# Altium PCB Adv-OLED_v2.0.PcbDoc
Units mm, origin at the board's own origin, x right, y up, seen from the top; angles counter-clockwise.
Board outline 87.98 x 43 mm, 2 copper layers (Top Layer, Bottom Layer), stack 1.448 mm thick; 22 components, 23 nets, 96 pads, 19 vias.
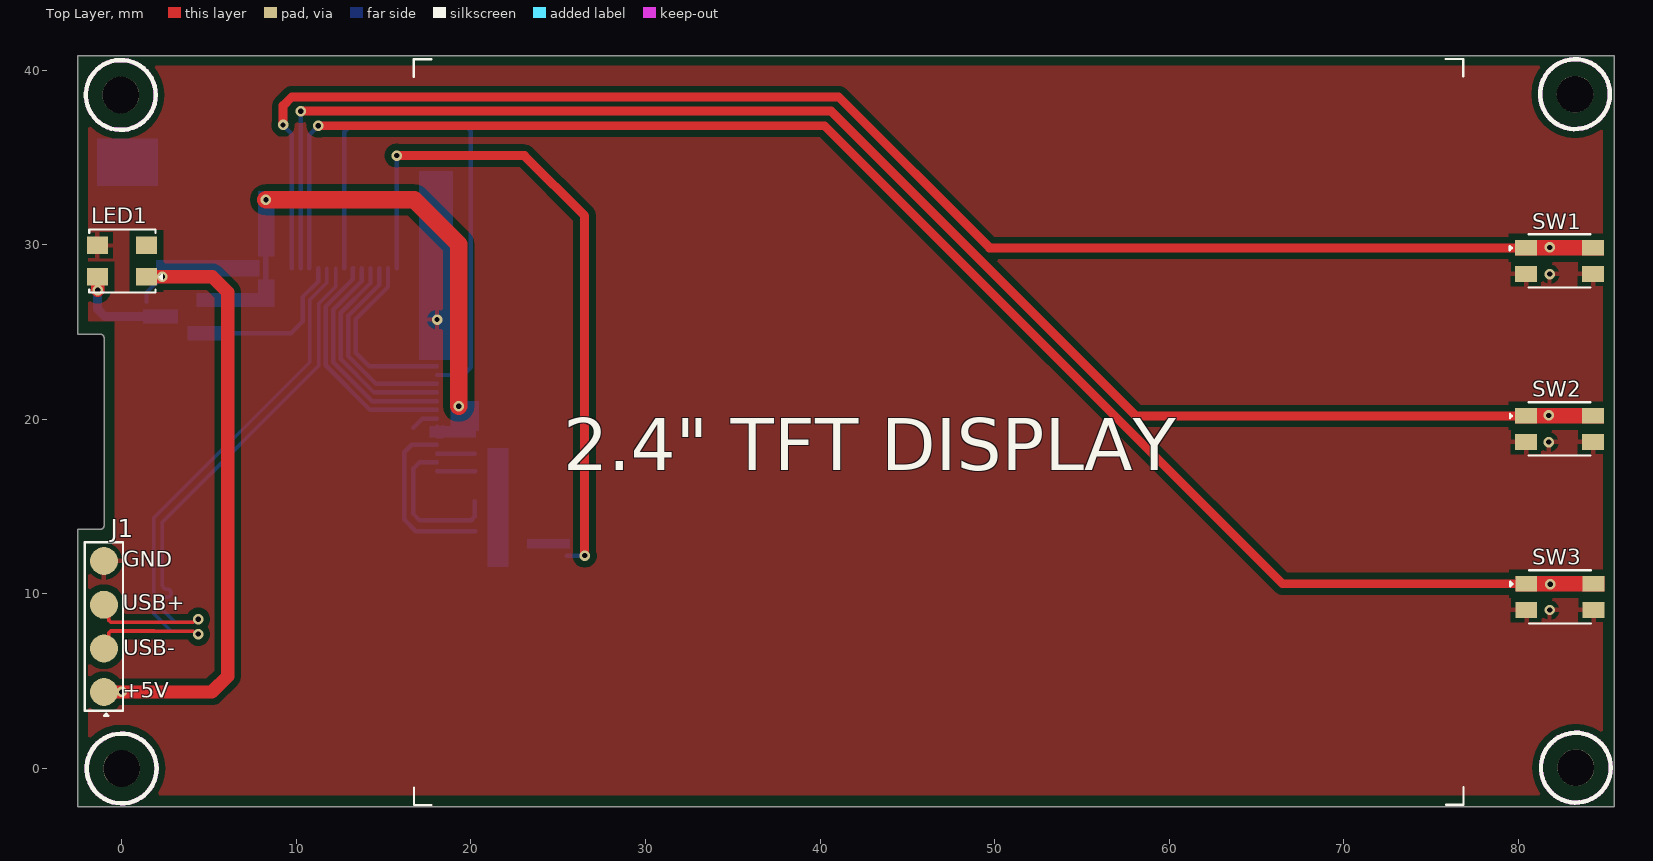
[diagram p0: Top Layer view]
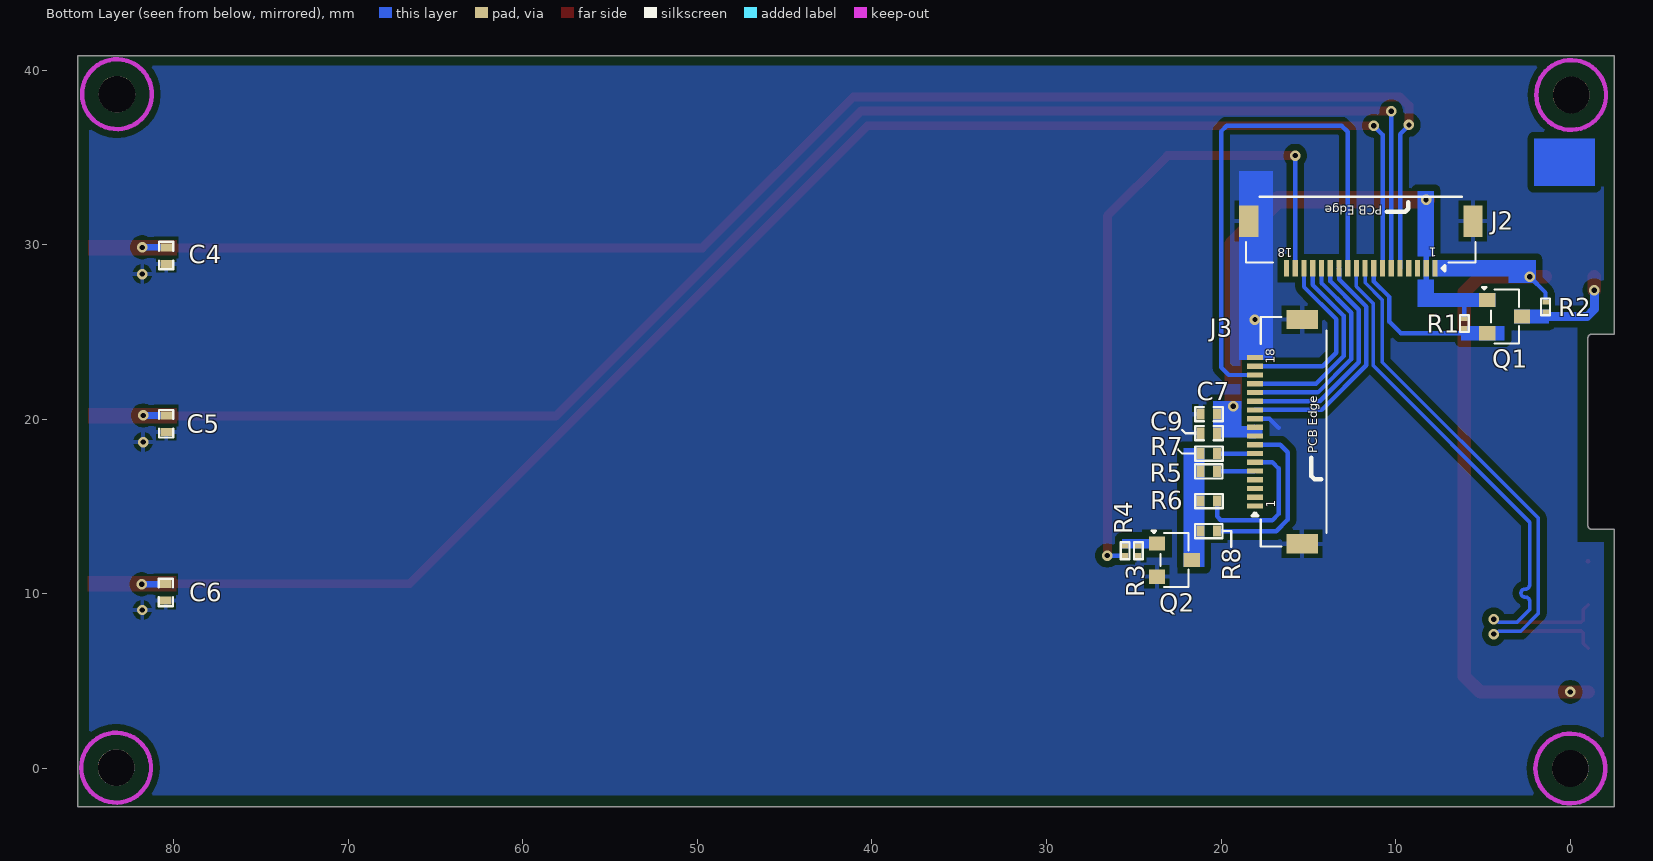
[diagram p1: Bottom Layer view, seen from below]
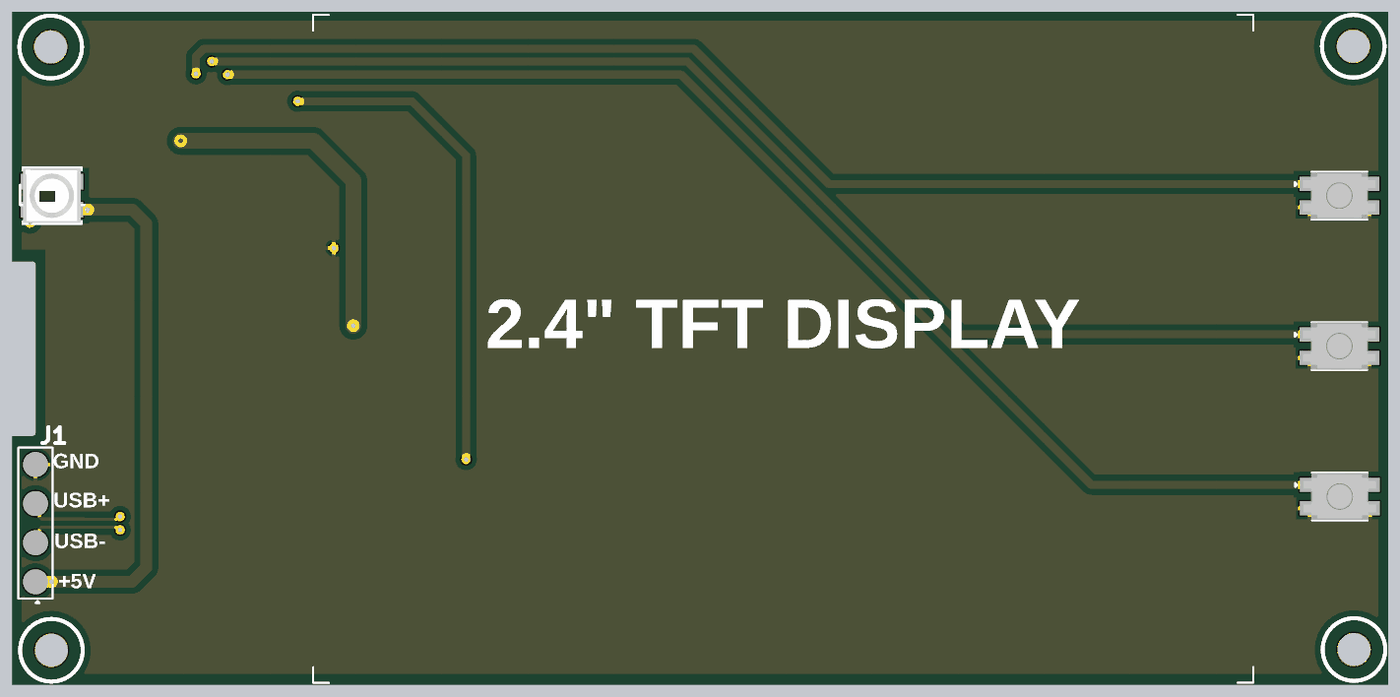
[diagram p2: 3D render of the assembled board from above, using the file's embedded part models]
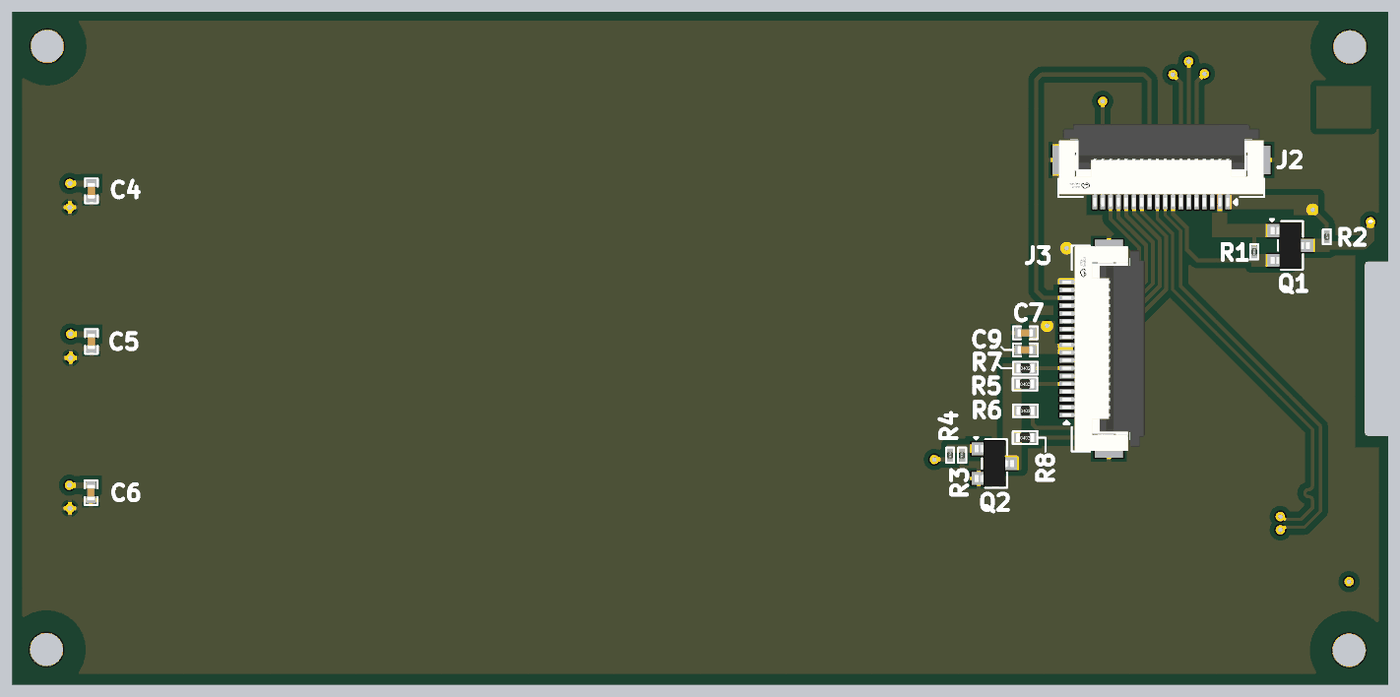
[diagram p3: 3D render of the assembled board from below, using the file's embedded part models]

## Layer stack, top to bottom
Top Solder: solder mask 0.0762, Solder Resist, Dk 3.5
Top Layer: signal copper 0.254
Dielectric 1: dielectric 0.9398, FR-4, Dk 4.8
Bottom Layer: signal copper 0.254
Bottom Solder: solder mask 0.0762, Solder Resist, Dk 3.5

## Board outline
-2.504,-2.19 -2.504,13.701 -1.223,13.699 -1.223,13.7 ccw(c-1.223,13.919) -1.004,13.919 -1.003,24.641 ccw(c-1.238,24.641) -1.238,24.876 -2.504,24.876 -2.504,40.81 85.474,40.81 85.474,-2.19

## Design rules (kind name [scope] priority, off if disabled: settings)
Clearance Clearance_Top [OnLayer('Top Layer')] p1: gap=0.381 ignorepadtopadclearanceinfootprint=FALSE except(0: Arc-Hole Track-Hole SMDPad-Hole THPad-Hole Via-Hole Fill-Hole Poly-Hole Region-Hole Text-Hole; 0.178: Arc-Arc Arc-Track Arc-SMDPad Track-Track Track-SMDPad SMDPad-SMDPad; 0.254: Arc-THPad Arc-Via Arc-Text Track-THPad Track-Via Track-Text SMDPad-THPad SMDPad-Via SMDPad-Text THPad-THPad THPad-Via THPad-Text Via-Via Via-Text Fill-Text Poly-Text Region-Text Text-Text)
Clearance Clearance_Bottom [OnLayer('Bottom Layer')] p2: gap=0.254 ignorepadtopadclearanceinfootprint=FALSE except(0: Arc-Hole Track-Hole SMDPad-Hole THPad-Hole Via-Hole Fill-Hole Poly-Hole Region-Hole Text-Hole; 0.178: Arc-Arc Arc-Track Arc-SMDPad Track-Track Track-SMDPad SMDPad-SMDPad SMDPad-Fill SMDPad-Region Fill-Fill; 0.203: Arc-Fill Arc-Region Track-Fill Track-Region Fill-Region Poly-Region Region-Region; 0.381: Arc-Poly Track-Poly SMDPad-Poly THPad-Fill THPad-Poly THPad-Region Via-Fill Via-Poly Via-Region Fill-Poly Poly-Poly)
ComponentClearance [All] p1: gap=0 collisioncheckmode=3 verticalgap=0 showdistances=FALSE
DiffPairsRouting [InDifferentialPairClass('USB_DIFF_Lines')] p1: maxlimit=0.305 minlimit=0.305 mostfreqgap=0.305 toplayer_minwidth=0.203 toplayer_maxwidth=0.203 toplayer_prefwidth=0.203 bottomlayer_minwidth=0.203 bottomlayer_maxwidth=0.203 bottomlayer_prefwidth=0.203 impedanceprofiledriven=TRUE impedanceprofileid={845F8E85-610F-405B-9380-0A08DA0184CC} impedanceprofilevalue=90.000000 maxuncoupledlength=12.7
HoleSize [All] p1: absolutevalues=TRUE maxlimit=25.4 minlimit=0.025 maxpercent=80.000 minpercent=20.000
MatchedLengths "Schematic Matched Net Lengths" [InNetClass('USB_DIFF')] p1: tolerance=0.508 checknetsindiffpair=TRUE checkdiffpairvsdiffpair=FALSE checkxsignals=FALSE checkothers=FALSE
MaxMinImpedance "Schematic Impedance Constraint" [InNetClass('USB_DIFF')] p1: minimum=85.00 maximum=95.00
MinimumSolderMaskSliver [All] p1: minsoldermaskwidth=0
PolygonConnect [All] p1: connectstyle=Relief reliefconductorwidth=0.254 reliefentries=4 polygonreliefangle="90 Angle" airgapwidth=0.254
RoutingVias [All] p1: holewidth=0.3 width=0.6 viastyle="Through Hole" minholewidth=0.3 minwidth=0.6 maxholewidth=0.3 maxwidth=0.6
SilkToSilkClearance [All] p1: silktosilkclearance=0
SilkToSolderMaskClearance [IsPad] p1: minsilkscreentomaskgap=0 clearancetoexposedcopper=TRUE
SolderMaskExpansion [All] p1: expansion=0.102 istentingtop=FALSE
Width [All] p1: maxlimit=1.016 minlimit=0.254 preferedwidth=0.381 minimp=50.000000 maximp=50.000000 favimp=50.000000
24 further rules are at their usual default settings.

## Classes and differential pairs
differential pair class USB_DIFF_Lines: USB
net class USB_DIFF: USB_N USB_P
differential pair USB: +USB_P -USB_N

## Components (designator, comment, footprint, x,y, rotation, side; value= is the part's Value field where it differs from the comment)
C4 "0.1uF" Cap-0402 80.416,29.375 r90 bottom
C5 "0.1uF" Cap-0402 80.416,19.748 r90 bottom
C6 "0.1uF" Cap-0402 80.442,10.084 r90 bottom
C7 "0.1uF" Cap-0402 20.701,20.295 r0 bottom
C9 "1uF" Cap-0402 20.701,19.202 r0 bottom
J1 "POGO Connector 4 Pin" "Pogo 4 Pin" -1.016,8.128 r90 top locked
J2 "F0502-B-18-15T-R" F0502-B-18-15T-R 12.004,30 r0 bottom
J3 "F0502-B-18-15T-R" F0502-B-18-15T-R 16.712,19.287 r90 bottom locked
LED1 "WS2812B-Mini" WS2812B-Mini 0.028,29.063 r180 top locked
Q1 "BSS138" Sot-23 3.759,25.883 r270 bottom
Q2 "S8050" SOT-23 22.682,11.938 r270 bottom
R1 "10K" Res-0201 6.071,25.476 r270 bottom
R2 "10K" Res-0201 1.422,26.441 r270 bottom
R3 "10K" Res-0201 24.74,12.471 r270 bottom
R4 "1K" Res-0201 25.502,12.471 r270 bottom
R5 "10R" Res-0402 20.714,17.022 r180 bottom
R6 "10R" Res-0402 20.701,15.314 r180 bottom
R7 "10R" Res-0402 20.701,18.034 r180 bottom
R8 "10R" Res-0402 20.714,13.595 r180 bottom
SW1 "TS-1185EC-C-D-B" TS-1185EC-C-D-B_ 82.349,29.068 r0 top locked
SW2 "TS-1185EC-C-D-B" TS-1185EC-C-D-B_ 82.35,19.448 r0 top locked
SW3 "TS-1185EC-C-D-B" TS-1185EC-C-D-B_ 82.373,9.828 r0 top locked

## Footprints (in the part's own frame and the unit in brackets; to place one, negate y for a bottom-side part, rotate by r counter-clockwise, add the part's x,y. Pads: shape width x height; smd on the part's side, far side on the other; paste and mask are expansions set on the pad)
Cap-0402 [mil]
  rect 18x25 smd mask+2.36: 1(-18.5,0) 2(18.5,0)
  silkscreen extent -31,-16 31,16, body extent -20,-10 20,10, height 19
F0502-B-18-15T-R [mm]
  rect 0.3x0.92 smd: 1(-4.25,1.35) 2(-3.75,1.35) 3(-3.25,1.35) 4(-2.75,1.35) 5(-2.25,1.35) 6(-1.75,1.35) 7(-1.25,1.35) 8(-0.75,1.35) 9(-0.25,1.35) 10(0.25,1.35) 11(0.75,1.35) 12(1.25,1.35) 13(1.75,1.35) 14(2.25,1.35) 15(2.75,1.35) 16(3.25,1.35) 17(3.75,1.35) 18(4.25,1.35)
  rect 1.1x1.8 smd: MP1(-6.42,-1.35) MP2(6.42,-1.35)
  silkscreen extent -6.58,-2.74 6.58,1.5, body extent -6.55,-3.66 6.55,1.69, height 2.03
"Pogo 4 Pin" [mm]
  round 1.6 smd: 1(-3.75,0) 2(-1.25,0) 3(1.25,0) 4(3.75,0)
  silkscreen extent -5.11,-1.09 4.83,1.09
Res-0201 [mm]
  rect 0.27x0.37 smd mask+0.055: 1(-0.275,0) 2(0.275,0)
  silkscreen extent -0.48,-0.25 0.48,0.25, body extent -0.3,-0.15 0.3,0.15, height 0.29
Res-0402 [mil]
  rect 18x25 smd mask+2.17: 1(-18.5,0) 2(18.5,0)
  silkscreen extent -32,-17 32,16, body extent -23,-11 23,11, height 16
Sot-23 [mm] "TRANS NPN 40V 0.6A SOT23"
  rect 0.82x0.92 smd: 1(-0.95,-1) 2(0.95,-1) 3(0,1)
  silkscreen extent -1.68,-1.3 1.55,0.81, body extent -1.5,-1.25 1.5,1.25, height 1.05
SOT-23 [mm] "TRANS NPN 40V 0.6A SOT23"
  rect 0.82x0.92 smd: 1(-0.95,-1) 2(0.95,-1) 3(0,1)
  silkscreen extent -1.68,-1.3 1.55,0.81, body extent -1.5,-1.25 1.5,1.25, height 1.05
TS-1185EC-C-D-B_ [mm]
  rect 1.25x0.9 smd: 1(-1.925,0.75) 1(1.925,0.75) 2(-1.925,-0.75) 2(1.925,-0.75)
  silkscreen extent -2.84,-1.52 1.78,1.52, body extent -2.33,-1.5 2.32,1.5, height 2
WS2812B-Mini [mm] "SMD,3.5x3.5mm Light Emitting Diodes (LED) RoHS"
  rect 1.2x1 smd: 1(-1.4,0.9) 2(-1.4,-0.9) 3(1.4,-0.9) 4(1.4,0.9)
  silkscreen extent -2.29,-1.8 1.88,1.8, body extent -1.84,-1.74 1.84,1.74, height 1.95

## Part data
C4 C5 C6 C7: library part C1005X5R1H104K050BB, "CAP CER 0.1UF 50V X5R 0402", Capacitance=100nF, Case Code (Imperial)=0402, Case Code (Metric)=1005, Dielectric=X5R, Dielectric Material=Ceramic, LCSC Part Number=C2181865, Manufacturer=TDK, Max Operating Temperature=85°C, Min Operating Temperature=-55°C, Package Quantity=1, Supplier Part Number 1=445-5942-1-ND, Tolerance=10%, Voltage=50V, Case/Package=0402, ComponentLink1Description=https://product.tdk.com/info/en/catalog/spec/mlccspec_commercial_general_midvoltage_en.pdf?src-supplier=Digi-Key, ComponentLink1URL=https://product.tdk.com/info/en/catalog/spec/mlccspec_commercial_general_midvoltage_en.pdf?src-supplier=Digi-Key, ComponentLink2Description=http://www.tdk.co.jp/tefe02/e413_c.pdf?src-supplier=Future+Electronics, ComponentLink2URL=http://www.tdk.co.jp/tefe02/e413_c.pdf?src-supplier=Future+Electronics, ComponentLink3Description=https://www.verical.com/server-webapp/html/getDatasheet?partID=743571&src-supplier=Verical, ComponentLink3URL=https://www.verical.com/server-webapp/html/getDatasheet?partID=743571&src-supplier=Verical, ComponentLink4Description=http://www.tdk.co.jp/tefe02/e412_c.pdf?src-supplier=Avnet+Europe, ComponentLink4URL=http://www.tdk.co.jp/tefe02/e412_c.pdf?src-supplier=Avnet+Europe, Construction=Flat, Depth=0.5mm, Height=0.5mm, Item Type=Capacitor, Lead Free="Lead Free", Length=1mm, Manufacturer Part Number=C1005X5R1H104K050BB, Mount="Surface Mount", Packaging="Tape and Reel", Pricing 1="1=0.12, 10=0.09, 50=0.049, 100=0.04, 500=0.02858, 1000=0.02245, 2500=0.02041, 5000=0.01878 (USD)", Radiation Hardening=No, REACH SVHC="No SVHC", Resistor Type=Ceramic, RoHS Compliant=Yes, Series=C, Stock 1=1455182, Supplier 1=Digi-Key, Termination=SMD/SMT, Thickness=0.022inch, Voltage Rating=50V, Voltage Rating (DC)=50V, Weight=2.3E-05oz, Width=0.02inch
C9: library part CC0402KRX5R6BB105, "CAP CER 1UF 10V X5R 0402", Case Code (Imperial)=0402, Case Code (Metric)=1005, Dielectric=X5R, LCSC Part Number=C106254, Manufacturer=Yageo, Max Operating Temperature=85°C, Min Operating Temperature=-55°C, Package Quantity=1, Resistor Type=Ceramic, Supplier Part Number 1=603-CC402KRX5R6BB105, Tolerance=10%, Voltage Rating=10V, Capacitance=1uF, Case/Package=0402, Category="Ceramic Capacitors", ComponentLink1Description=https://datasheet.ciiva.com/176/upy-gphc-x5r-4v-to-50v-12-176704.pdf?src-supplier=Digi-Key, ComponentLink1URL=https://datasheet.ciiva.com/176/upy-gphc-x5r-4v-to-50v-12-176704.pdf?src-supplier=Digi-Key, ComponentLink2Description=https://datasheet.ciiva.com/176/mlccorderingcode-176705.pdf?src-supplier=Digi-Key, ComponentLink2URL=https://datasheet.ciiva.com/176/mlccorderingcode-176705.pdf?src-supplier=Digi-Key, ComponentLink3Description=https://datasheet.ciiva.com/176/mlccorderingcode-176706.pdf?src-supplier=Digi-Key, ComponentLink3URL=https://datasheet.ciiva.com/176/mlccorderingcode-176706.pdf?src-supplier=Digi-Key, Construction=Flat, Depth=0.5mm, Dissipation Factor=15%, Halogen Free="Halogen Free", Height=0.5mm, Item Type=Capacitor, Lead Free="Lead Free", Length=1mm, Manufacturer Part Number=CC0402KRX5R6BB105, Mount="Surface Mount", Number of Pins=2, Packaging="Tape and Reel", Pricing 1="1=0.11000, 10=0.05500, 50=0.05500, 100=0.03300, 500=0.02700, 1000=0.02200, 2500=0.02100, 10000=0.01800 (USD)", Radiation Hardening=No, REACH SVHC="No SVHC", RoHS=Yes, RoHS Compliant=Yes, Series=CC, Stock 1=6711367, Supplier 1=Mouser, Termination=SMD/SMT, Thickness=0.022inch, Voltage Rating (DC)=10V, Width=0.02inch
J1: "Pogo Pad 2.5mm 4 Pin", Item Type="Pogo Connector", Manufacturer Part Number="POGO Connector 4 Pin"
J2 J3: "Clamshell -25℃~+85℃ 18P Bottom Contact Surface Mount 0.5mm SMD,P=0.5mm FFC/FPC Connectors ROHS", LCSC Part Number=C2889974, Manufacturer=XFCN, Package=SMD,P=0.5mm, ComponentLink1Description=LCSC, ComponentLink1URL=https://www.lcsc.com/product-detail/FFC-FPC-Connectors_XFCN-F0502-B-18-15T-R_C2889974.html, Item Type="FPC Connector", Manufacturer Part Number=F0502-B-18-15T-R
LED1: "SMD,3.5x3.5mm Light Emitting Diodes (LED) RoHS", LCSC Part Number=C527089, Manufacturer=Worldsemi, Package=SMD,3.5x3.5mm, ComponentLink1Description=LCSC, ComponentLink1URL=*https://lcsc.com/product-detail/Light-Emitting-Diodes-LED_Worldsemi-WS2812B-Mini_C527089.html, Item Type="RGB LED", Manufacturer Part Number=WS2812B-Mini
Q1: "50V 220mA 3.5Ω@10V,220mA 225mW 1.6V@1mA N Channel SOT-23 MOSFETs ROHS", LCSC Part Number=C426569, Manufacturer="Slkor(SLKORMICRO Elec.)", Package=SOT-23, ComponentLink1Description=LCSC, ComponentLink1URL=https://www.lcsc.com/product-detail/MOSFETs_Slkor-SLKORMICRO-Elec-BSS138_C426569.html, Item Type=Mosfet, Manufacturer Part Number=BSS138
Q2: "Trans Gp Bjt NPN 25V 1.5A 300MW 3-PIN SOT-23 T/r", Case/Package=TO-236-3, Collector Emitter Breakdown Voltage=25V, Collector Emitter Voltage (VCEO)=400mV, LCSC Part Number=C105433, Manufacturer=Comchip, Manufacturer Part Number=SS8050-G, Max Collector Current=1.5A, Max Power Dissipation=300mW, Transition Frequency=100MHz, ComponentLink1Description="http://www.comchiptech.com/admin/files/product/SS8050-G RevA181526.pdf?src-supplier=Digi-Key", ComponentLink1URL="http://www.comchiptech.com/admin/files/product/SS8050-G RevA181526.pdf?src-supplier=Digi-Key", ComponentLink2Description=http://www.comchiptech.com/cms/UserFiles/SS8050-G%20RevA181526.pdf?src-supplier=Digi-Key, ComponentLink2URL=http://www.comchiptech.com/cms/UserFiles/SS8050-G%20RevA181526.pdf?src-supplier=Digi-Key, Max Breakdown Voltage=25V, Mount="Surface Mount", Packaging="Tape and Reel", Pricing 1="1=0.26480, 10=0.19960, 25=0.19760, 50=0.19590, 100=0.09990, 250=0.09890, 500=0.07670, 1000=0.05180 (USD)", RoHS=Yes, Stock 1=2514, Supplier 1="Arrow Electronics", Supplier Part Number 1=SS8050-G
R1 R2 R3: library part RC0201FR-0710KL, "RES SMD 10K OHM 1% 1/20W 0201", LCSC Part Number=C106225, Manufacturer=Yageo, Package=0201, ComponentLink7Description=LCSC, ComponentLink7URL=https://www.lcsc.com/product-detail/Chip-Resistor-Surface-Mount_YAGEO-RC0201FR-0710KL_C106225.html, Item Type=Resistor, Manufacturer Part Number=RC0201FR-0710KL
R4: library part RC0201FR-071KP, "RES 1K OHM 1% 1/20W 0201", LCSC Part Number=C3953443, Manufacturer=Yageo, Supplier Part Number 1=13-RC0201FR-071KPCT-ND, Manufacturer Part Number=RC0201FR-071KP, Pricing 1="1=0.11000, 10=0.10200, 100=0.03940, 1000=0.01734, 2500=0.01497, 5000=0.01340 (USD)", RoHS=Yes, RoHS Compliant=Yes, Stock 1=4800, Supplier 1=Digi-Key
R5 R6 R7 R8: library part CRCW040210R0FKEDHP, "RES SMD 10 OHM 1% 1/5W 0402", Case Code (Imperial)=0402, Case Code (Metric)=1005, LCSC Part Number=C4013850, Manufacturer="Vishay Dale", Max Operating Temperature=155°C, Max Power Dissipation=200mW, Min Operating Temperature=-55°C, Package Quantity=10000, Power Rating=125mW, Resistance Tolerance=1%, Resistor Type="Thick Film", Supplier Part Number 1=541-10.0YCT-ND, Temperature Coefficient=100ppm/°C, Voltage Rating=50V, Case/Package=0402, ComponentLink1Description=http://www.mouser.com/ds/2/427/crcwhpe3-46056.pdf?src-supplier=Mouser, ComponentLink1URL=http://www.mouser.com/ds/2/427/crcwhpe3-46056.pdf?src-supplier=Mouser, Construction=Rectangular, Contact Plating=Tin, Depth=0.5mm, Features="Automotive AEC-Q200", Height=0.3mm, Lead Free="Lead Free", Length=1mm, Manufacturer Part Number=CRCW040210R0FKEDHP, Military Standard=Not, Mount="Surface Mount", Number of Terminations=2, Packaging="Tape and Reel", Pricing 1="1=0.15, 10=0.132, 100=0.0506, 1000=0.02226, 2500=0.01923, 5000=0.0172 (USD)", Radiation Hardening=No, REACH SVHC=Unknown, Resistance=10R, RoHS Compliant=Yes, Series=CRCW-HP, Stock 1=28500, Supplier 1=Digi-Key, Technology="THICK FILM", Termination=SMD/SMT, Tolerance=1%, Voltage Rating (DC)=50V, Weight=2.3E-05oz, Width=0.5mm
SW1 SW2 SW3: "3mm 2mm Round Button 50mA Top3.65mm SPST 12V SMD Tactile Switches", LCSC Part Number=C318893, Manufacturer=XKB, ComponentLink1Description=LCSC, ComponentLink1URL=https://lcsc.com/product-detail/Tactile-Switches_XKB-Connectivity-TS-1185EC-C-D-B_C318893.html, Manufacturer Part Number=TS-1185EC-C-D-B

## Free pads (board coordinates)
  round 2.1 hole 2.1: MH4(-0.047,38.574) MH4(0,0) MH4(83.237,38.621) MH4(83.284,0.047)

## Via types
v1: diameter 0.6, hole 0.3, Top Layer to Bottom Layer, 19 vias

## Nets (pads, with @x,y where several pads share a name; then routed paths per layer and width w, separated by ;. In a path a pad name is that pad's centre, name@x,y a point inside that pad or via, vN(x,y) a via of type N, cw(c..) or ccw(c..) an arc to the next point about the centre after c; other vN are vias at no path point)
3V3: C7.1 C9.1 J2.2 J3.9 J3.10 Q1.1 R1.1 | length 25.5
  Top Layer w1.016: v1(8.266,32.572) 16.755,32.572 19.304,30.023 v1(19.304,20.752)
  Bottom Layer w0.254: Q1.1 5.769,26.833 6.071,26.531 R1.1 ; J3.9 18.36,19.037 18.383,19.06 J3.10@18.383,19.545 ; J3.10 J3.10@18.085,19.56 ; v1(19.304,20.752) 19.329,20.726 20.231,20.726 ; 20.157,19.56 20.231,19.634
5V: J1.1 J2.1 LED1.1 R2.1 | length 36.3
  Top Layer w0.762: J1.1 -1.012,4.382 -0.004,4.382 v1(0,4.386) 5.173,4.386 6.071,5.283 6.071,27.28 5.187,28.163 v1(2.327,28.163) LED1.1
  Bottom Layer w0.254: R2.1 1.422,27.259 v1(2.327,28.163)
BACKLIGHT_CONTROL: J2.17 R4.2 | length 39.1
  Top Layer w0.508: v1(15.754,35.103) 23.063,35.103 26.518,31.648 v1(26.518,12.196)
  Bottom Layer w0.254: J2.17 v1(15.754,35.103) ; R4.2 v1(26.518,12.196)
BTN1: C4.2 J2.5 SW1.1 | length 87.2
  Top Layer w0.508: v1(9.246,36.858) 9.246,37.961 9.74,38.456 41.068,38.456 49.706,29.818 SW1.1@80.424,29.818
  Top Layer w0.762: SW1.1@80.424,29.818 80.451,29.845 v1(81.788,29.845)
  Bottom Layer w0.254: v1(9.246,36.858) 9.246,36.839 9.754,36.331 J2.5
  Bottom Layer w0.381: C4.2 v1(81.788,29.845)
BTN2: C5.2 J2.6 SW2.1 | length 89
  Top Layer w0.508: v1(10.254,37.648) 40.635,37.648 58.085,20.198 SW2.1@80.425,20.198
  Top Layer w0.762: SW2.1@80.425,20.198 80.445,20.218 v1(81.737,20.218)
  Bottom Layer w0.254: J2.6 v1(10.254,37.648)
  Bottom Layer w0.381: C5.2 v1(81.737,20.218)
BTN3: C6.2 J2.7 SW3.1 | length 91.2
  Top Layer w0.508: v1(11.262,36.809) 40.254,36.809 66.486,10.578 SW3.1@80.448,10.578
  Top Layer w0.762: SW3.1@80.448,10.578 81.789,10.578 v1(81.813,10.554)
  Bottom Layer w0.254: J2.7 10.754,36.301 v1(11.262,36.809)
  Bottom Layer w0.381: C6.2 v1(81.813,10.554)
D/C: J2.15 J3.15 | length 11.5
  Bottom Layer w0.254: J2.15@14.754,28.65 14.754,27.692 12.979,25.918 12.979,23.625 14.567,22.037 J3.15
GND: C4.1 C5.1 C6.1 C7.2 C9.2 J1.4 J2.MP1 J2.MP2 J3.11 J3.18 J3.MP1 J3.MP2 LED1.3 Q2.2 R3.2 SW1.2 SW2.2 SW3.2 | length 1.6
  Top Layer w0.254: J1.4 J1.4@-1.008,11.87
  Bottom Layer w0.254: 16.712,19.52 17.229,20.037 J3.11
  other v1: 81.789,9.078 81.737,18.698 18.062,25.707 81.788,28.318
"LED DATA": J2.8 Q1.2 R1.2 | length 8.8
  Bottom Layer w0.254: 5.219,24.933 9.703,24.933 10.363,25.593 10.363,27.002 11.254,27.893 J2.8
NetJ3_5: J3.5 R5.2 | length 2.2
  Bottom Layer w0.254: J3.5 18.07,17.03 20.237,17.03 R5.2
NetJ3_6: J3.6 R6.2 | length 8.7
  Bottom Layer w0.254: J3.6 17.062,17.537 16.712,17.187 16.712,14.574 17.062,14.224 20.016,14.224 20.231,14.439 R6.2
NetJ3_7: J3.7 R7.2 | length 2.2
  Bottom Layer w0.254: J3.7 18.064,18.036 20.229,18.036 R7.2
NetJ3_8: J3.8 R8.2 | length 10.2
  Bottom Layer w0.254: J3.8 16.612,18.537 16.189,18.114 16.189,14.258 16.852,13.595 R8.2
NetLED1_4: LED1.4 Q1.3 R2.2 | length 6.2
  Top Layer w0.762: v1(-1.372,27.394) LED1.4
  Bottom Layer w0.508: v1(-1.372,27.394) -1.372,26.301 -0.959,25.888 Q1.3@2.754,25.888
NetQ2_1: Q2.1 R3.1 R4.1
NetQ2_3: Q2.3 R5.1 R6.1 R7.1 R8.1
SLOTA_MISO: J2.12 J3.12 | length 13.6
  Bottom Layer w0.254: J2.12 13.246,28.642 13.246,28.017 11.684,26.455 11.684,23.089 14.235,20.537 J3.12
SLOTA_MOSI: J2.13 J3.13 | length 12.9
  Bottom Layer w0.254: J2.13 13.754,27.914 12.116,26.276 12.116,23.267 14.346,21.037 J3.13
SLOTA_SCLK: J2.11 J3.16 | length 31
  Bottom Layer w0.254: J2.11 12.754,36.46 13.104,36.809 19.68,36.809 20.002,36.487 20.002,22.982 19.558,22.537 J3.16
TFT_CS: J2.14 J3.14 | length 12.2
  Bottom Layer w0.254: J2.14 14.254,27.803 12.548,26.097 12.548,23.446 14.457,21.537 J3.14
TFT_RESET: J2.16 J3.17 | length 10.6
  Bottom Layer w0.254: J2.16 15.254,27.582 13.411,25.739 13.411,23.804 14.178,23.037 J3.17
USB_N: J1.2 J2.9 | length 32.8
  Top Layer w0.203: J1.2 -0.749,7.145 -0.749,7.755 -0.63,7.874 1.864,7.874 1.869,7.869 4.114,7.869
  Bottom Layer w0.203: v1(4.394,7.696) 4.287,7.696 4.114,7.869 2.842,7.869 1.829,8.883 1.829,14.326 10.77,23.266 10.77,26.833 11.754,27.817 J2.9
USB_P: J1.3 J2.10 | length 32.6
  Top Layer w0.203: J1.3 -0.749,9.111 -0.749,8.501 -0.63,8.382 2.074,8.382 2.079,8.377 4.114,8.377
  Bottom Layer w0.203: v1(4.394,8.55) 4.287,8.55 4.114,8.377 3.053,8.377 2.398,9.032 2.337,9.093 2.337,9.591 cw(c2.565,9.591) 2.565,9.819 2.601,9.819 ccw(c2.601,10.048) 2.601,10.276 2.565,10.276 cw(c2.565,10.505) 2.337,10.505 2.337,11.087 2.337,14.115 11.278,23.056 11.278,26.623 12.262,27.607 J2.10@12.262,28.65
pads on no net: J2.3 J2.4 J2.18 J3.1 J3.2 J3.3 J3.4 LED1.2

## Polygon pours and split planes (outlines as drawn)
GND on Top Layer "GND_L01_P000" (solid, pour order 0): 84.836,40.259 84.836,-1.524 -1.905,-1.524 -1.905,12.954 -0.381,12.954 -0.381,25.622 -1.873,25.622 -1.905,25.654 -1.905,40.259
GND on Bottom Layer "GND_L02_P001" (solid, remove dead copper, pour order 1): 84.836,40.259 84.836,-1.524 -1.905,-1.524 -1.905,12.954 -0.381,12.954 -0.381,25.622 -1.873,25.622 -1.905,25.654 -1.905,40.259

## Keep-outs
Keep-Out Layer:
  circle w0.254: c0,0 r1.999
  circle w0.254: c83.284,0.047 r1.999
  circle w0.254: c83.237,38.621 r1.999
  circle w0.254: c-0.047,38.574 r1.999

## Other copper
Top Layer:
  rectangle net BTN3: 79.823,10.128 84.923,11.028
  rectangle net BTN2: 79.8,19.748 84.9,20.648
  rectangle net BTN1: 79.799,29.368 84.899,30.268
Bottom Layer:
  rectangle net 3V3: 8.104,27.243 8.407,29.693
  rectangle net 5V: 2.759,28.19 7.904,29.11
  rectangle net 3V3: 7.798,26.423 8.754,27.994
  rectangle net GND: 17.018,23.555 18.36,24.019
  rectangle net 3V3: 7.798,29.312 8.754,33.071
  rectangle net 5V: 1.956,27.813 3.531,29.11
  rectangle net 3V3: 4.299,26.423 8.754,27.243
  rectangle net GND: 17.018,23.387 18.974,34.211
  rectangle net 3V3: 17.645,18.963 20.307,19.611
  rectangle net NetQ2_1: 23.222,12.611 25.687,13.146
  rectangle net 3V3: 18.821,19.317 20.46,21.044
  rectangle net 5V: -1.397,33.363 2.087,36.068
  rectangle net "LED DATA": 3.759,24.523 6.256,25.343
  rectangle net NetLED1_4: 1.237,25.473 3.219,26.301
  rectangle net NetQ2_3: 20.942,11.528 22.142,18.351

## Silkscreen, mask and mechanical layers (free items; w line width, h text height)
Top Overlay:
  circle w0.254: c83.237,38.621 r2
  circle w0.254: c83.284,0.047 r2
  circle w0.254: c0,0 r2
  circle w0.254: c-0.047,38.574 r2
  lines w0.127: 16.727,39.621 16.727,40.621 17.727,40.621 ; 16.741,-1.085 16.741,-2.085 17.741,-2.085 ; 75.838,40.635 76.838,40.635 76.838,39.635 ; 75.853,-2.071 76.853,-2.071 76.853,-1.071
  text "2.4\" TFT DISPLAY" at 25.291,16.096 h5.08
  text "GND" at 0.102,11.244 h1.52
  text "USB+" at 0.051,8.744 h1.52
  text "USB-" at 0.079,6.179 h1.52
  text "+5V" at 0.076,3.744 h1.52
Bottom Overlay:
  lines w0.127: 19.419,12.7 19.419,13.595 19.927,13.595 ; 21.488,18.034 22.225,18.034 22.479,18.288 ; 21.488,19.202 22.047,19.202 22.225,19.38
Dimensions:
  lines w0.254: -9.497,38.549 -1.267,38.549 -2.283,39.412 ; -2.156,37.507 -1.293,38.523
  text "Mounting Hole" at -24.94,40.987 h1.52
  text "Dia=3mm" at -20.266,38.117 h1.52
Board Outline:
  lines w0.127: -2.504,-2.19 -2.504,13.701 -1.223,13.699 ccw(c-1.223,13.919) -1.004,13.919 -1.003,24.641 ccw(c-1.238,24.641) -1.238,24.876 -2.504,24.876 -2.504,40.81 85.496,40.81 85.496,-2.19 -2.504,-2.19 ; -2.504,-2.19 -2.504,-2.19
Fabrication:
  drawing of 191 lines, arcs and shapes, not listed
  text "Layer" at -17.991,76.268 h1.52
  text "Name" at -7.579,76.268 h1.52
  text "Material" at 16.036,76.268 h1.52
  text "Thickness" at 37.874,76.268 h1.52
  text "Constant" at 54.38,76.268 h1.52
  text "Board Layer Stack" at 68.854,76.268 h1.52
  text "Top Overlay" at -7.579,73.22 h1.52
  text "Top Solder" at -7.579,70.172 h1.52
  text "Solder Resist" at 16.036,70.172 h1.52
  text "0.076mm" at 37.874,70.172 h1.52
  text "3.5" at 54.38,70.172 h1.52
  text "1" at -17.991,67.124 h1.52
  text "Top Layer" at -7.579,67.124 h1.52
  text "0.254mm" at 37.874,67.124 h1.52
  text "Dielectric 1" at -7.579,64.076 h1.52
  text "FR-4" at 16.036,64.076 h1.52
  text "0.940mm" at 37.874,64.076 h1.52
  text "4.8" at 54.38,64.076 h1.52
  text "2" at -17.991,61.028 h1.52
  text "Bottom Layer" at -7.579,61.028 h1.52
  text "0.254mm" at 37.874,61.028 h1.52
  text "Bottom Solder" at -7.579,57.98 h1.52
  text "Solder Resist" at 16.036,57.98 h1.52
  text "0.076mm" at 37.874,57.98 h1.52
  text "3.5" at 54.38,57.98 h1.52
  text "Bottom Overlay" at -7.579,54.932 h1.52
  text "Total board thickness:" at -17.991,51.884 h1.52
  text "1.600mm" at 37.874,51.884 h1.52
Drill Drawing:
  circle w0.254: c-17.51,87.143 r0.847
  lines w0.254: -18.357,90.106 -16.663,90.106 -16.663,91.8 -18.357,91.8 -18.357,90.106
  lines w0.381: -19.876,85.153 246.091,85.153 ; -19.876,92.773 246.091,92.773 ; -5.883,81.343 -5.883,96.584 ; 7.829,81.343 7.829,96.584 ; 35.507,81.343 35.507,96.584 ; 48.356,81.343 48.356,96.584 ; 66.995,81.343 66.995,96.584 ; 105.084,81.343 105.084,96.584 ; 120.066,81.343 120.066,96.584 ; 139.009,81.343 139.009,96.584 ; 155.515,81.343 155.515,96.584 ; 177.2,81.343 177.2,96.584 ; 211.074,81.343 211.074,96.584 ; -19.876,81.343 246.091,81.343 246.091,96.584 -19.876,96.584 -19.876,81.343
  text "Symbol" at -17.59,93.916 h1.83
  text "Count" at -4.74,93.916 h1.83
  text "Hole Size" at 8.972,93.916 h1.83
  text "Plated" at 36.65,93.916 h1.83
  text "Hole Type" at 49.499,93.916 h1.83
  text "Drill Layer Pair" at 68.138,93.916 h1.83
  text "Via/Pad" at 106.227,93.916 h1.83
  text "Pad Shape" at 121.209,93.916 h1.83
  text "Template" at 140.152,93.916 h1.83
  text "Description" at 156.658,93.916 h1.83
  text "Hole Tolerance (+)" at 178.343,93.916 h1.83
  text "Hole Tolerance (-)" at 212.217,93.916 h1.83
  text "4" at -4.74,90.106 h1.52
  text "82.68mil (2.100mm)" at 8.972,90.106 h1.52
  text "PTH" at 36.65,90.106 h1.52
  text "Round" at 49.499,90.106 h1.52
  text "Top Layer - Bottom Layer" at 68.138,90.106 h1.52
  text "Pad" at 106.227,90.106 h1.52
  text "Rounded" at 121.209,90.106 h1.52
  text "c210h210" at 140.152,90.106 h1.52
  text "19" at -4.74,86.296 h1.52
  text "11.81mil (0.300mm)" at 8.972,86.296 h1.52
  text "PTH" at 36.65,86.296 h1.52
  text "Round" at 49.499,86.296 h1.52
  text "Top Layer - Bottom Layer" at 68.138,86.296 h1.52
  text "Via" at 106.227,86.296 h1.52
  text "Rounded" at 121.209,86.296 h1.52
  text "v60h30" at 140.152,86.296 h1.52
  text "23 Total" at -4.74,82.486 h1.52

## Dimensions
85.496,-2.19 to -2.504,-2.19 on Dimensions
85.474,40.81 to 85.474,-2.19 on Dimensions

## Text inside footprints (layer, text, board x,y; h text height)
J2: Bottom Overlay "18" at 15.907,29.793 h0.5 r180; Bottom Overlay "1" at 7.652,29.818 h0.5 r180; Bottom Overlay "PCB Edge" at 10.759,32.221 h0.5 r180
J3: Bottom Overlay "PCB Edge" at 14.491,18.043 h0.5 r270; Bottom Overlay "1" at 16.894,14.936 h0.5 r270; Bottom Overlay "18" at 16.919,23.191 h0.5 r270